# Altium PCB PCB1.PcbDoc (part 1 of 2)
Units mm, origin at the board's own origin, x right, y up, seen from the top; angles counter-clockwise.
Board outline 185 x 38 mm, 4 copper layers (Top Layer, POWER, GND, Bottom Layer), stack 0.603 mm thick; 116 components, 81 nets, 423 pads, 394 vias.
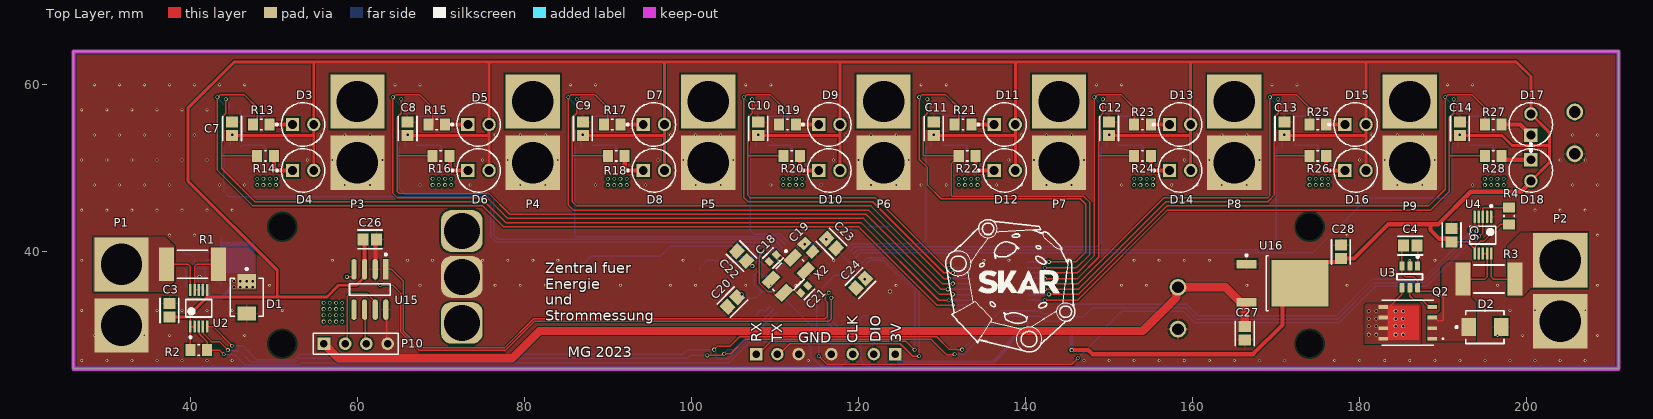
[diagram p0: Top Layer view]
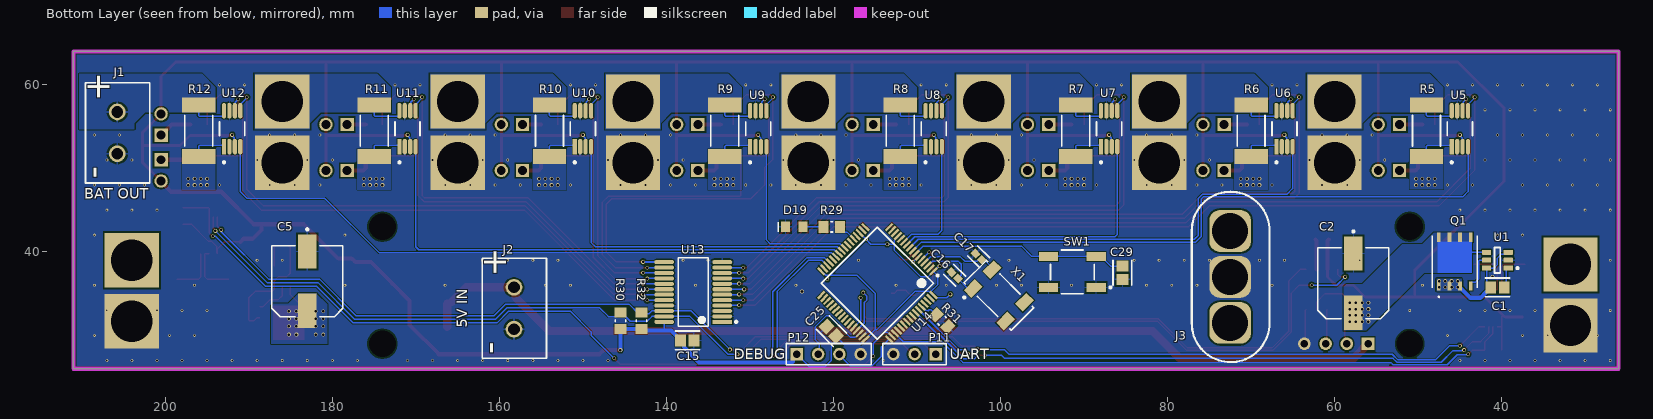
[diagram p1: Bottom Layer view, seen from below]
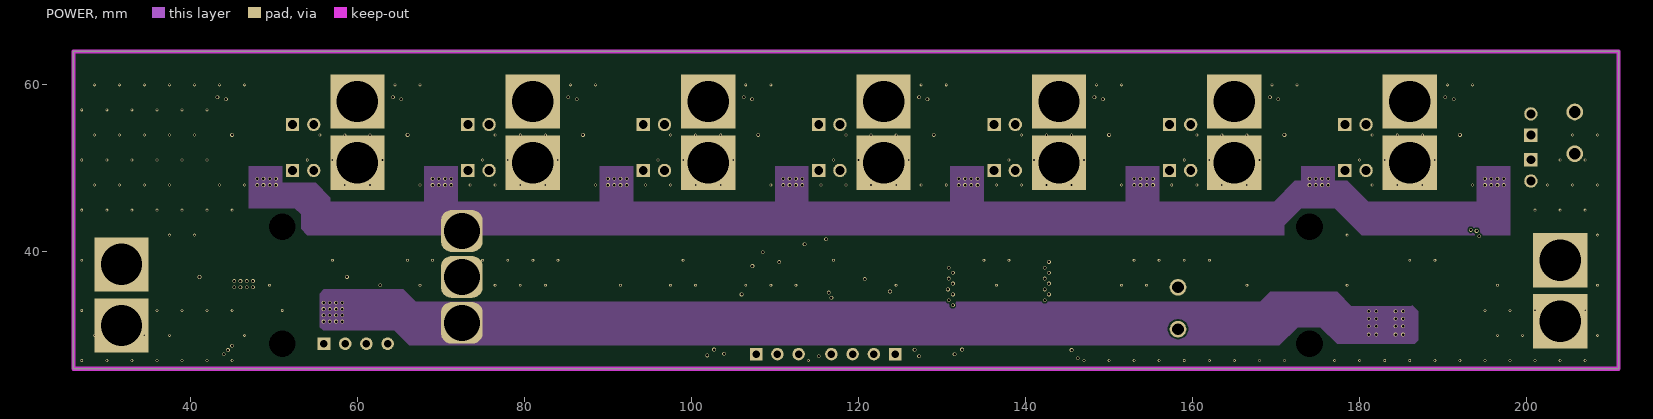
[diagram p2: POWER]
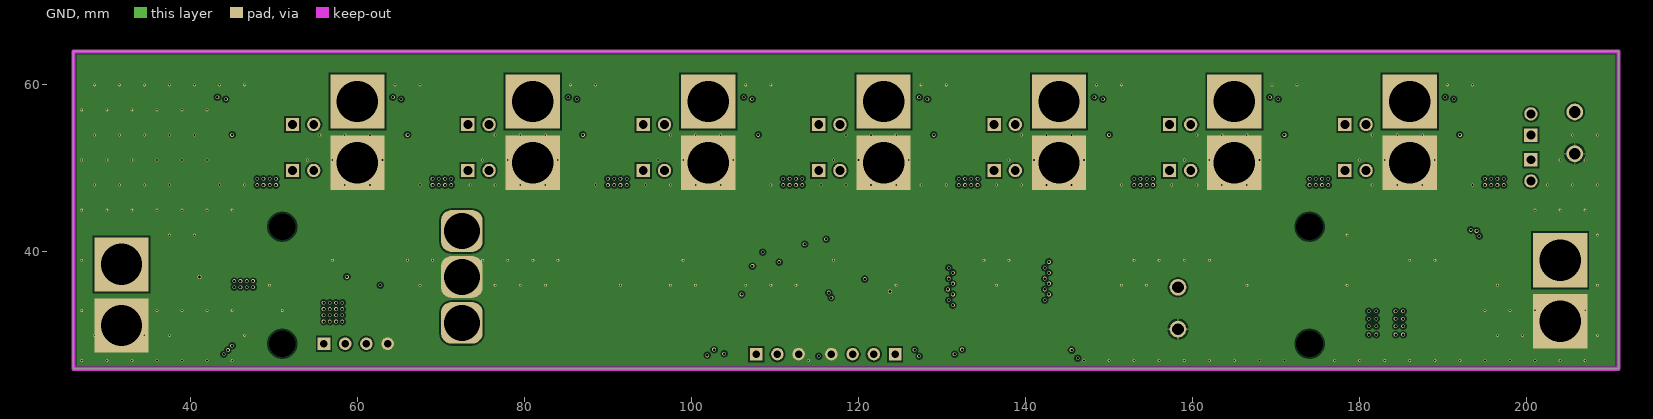
[diagram p3: GND]
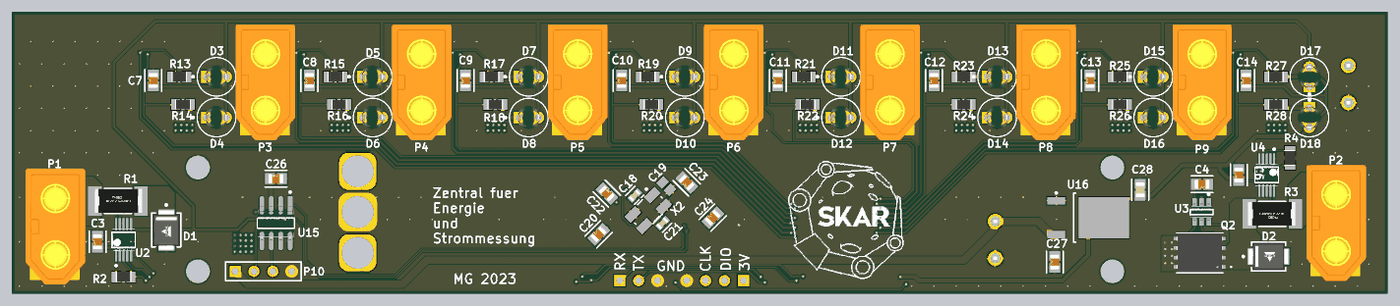
[diagram p5: 3D render of the assembled board from above, using the file's embedded part models]
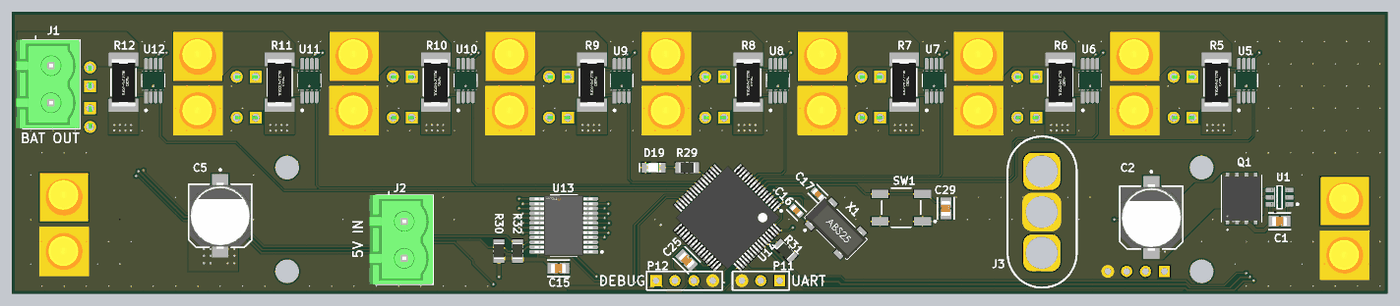
[diagram p6: 3D render of the assembled board from below, using the file's embedded part models]

## Layer stack, top to bottom
Top Solder: solder mask 0.0102, Solder Resist, Dk 3.5
Top Layer: signal copper 0.0356
Dielectric 2: prepreg 0.0711, PP-006, Dk 4.1
POWER: signal copper 0.035
Dielectric 1: dielectric 0.32, FR-4, Dk 4.8
GND: signal copper 0.035
Dielectric 3: prepreg 0.0711, PP-006, Dk 4.1
Bottom Layer: signal copper 0.0356
Bottom Solder: solder mask 0.0102, Solder Resist, Dk 3.5

## Board outline
26,26 26,64 211,64 211,26

## Design rules (kind name [scope] priority, off if disabled: settings)
Clearance Clearance_POWER [(InNet('NetC205_2') OR InNet('NETC203_2') OR InNet('NETC206_2') OR InNet('NetP410_1') OR InNet('NetP410_3') OR InNet('VM'))] p1: gap=0.254 ignorepadtopadclearanceinfootprint=FALSE except(0: SMDPad-Hole THPad-Hole Via-Hole Fill-Hole Poly-Hole Region-Hole Text-Hole; 0.1: Arc-Arc Arc-Track Track-Track; 0.127: Arc-THPad Arc-Fill Arc-Poly Arc-Region Track-THPad Track-Fill Track-Poly Track-Region SMDPad-SMDPad; 0.2: Arc-SMDPad Track-SMDPad; 0.5: THPad-THPad THPad-Fill THPad-Poly THPad-Region Fill-Fill Fill-Poly Fill-Region Poly-Poly Poly-Region Region-Region)
Clearance [All] p2: gap=0.127 ignorepadtopadclearanceinfootprint=FALSE except(0: SMDPad-Hole THPad-Hole Via-Hole Fill-Hole Poly-Hole Region-Hole Text-Hole; 0.1: Arc-Arc Arc-Track Track-Track; 0.2: Arc-SMDPad Track-SMDPad THPad-Fill THPad-Poly THPad-Region Via-Fill Via-Poly Via-Region; 0.254: Arc-Via Arc-Text Arc-Hole Track-Via Track-Text Track-Hole SMDPad-THPad SMDPad-Via SMDPad-Text THPad-Via THPad-Text Via-Via Via-Text Fill-Text Poly-Text Region-Text Text-Text; 0.5: THPad-THPad)
ComponentClearance [All] p1: gap=0.127 collisioncheckmode=3 verticalgap=0.254 showdistances=FALSE
HoleSize [All] p1: absolutevalues=TRUE maxlimit=6.5 minlimit=0.025 maxpercent=80.000 minpercent=20.000
MinimumSolderMaskSliver [All] p1: minsoldermaskwidth=0.08
PlaneClearance [All] p1: clearance=0.2
PlaneConnect [All] p1: planeconnectstyle=Direct reliefexpansion=0.508 reliefentries=4 reliefconductorwidth=0.254 reliefairgap=0.254
PolygonConnect PolygonConnect_GND_POWER [InNet('GND') vs (HasFootprint('FP-FC-G-MFG') OR HasFootprint('FP-CL32-IPC_B') OR HasFootprint('TSON Advance_TOS') OR HasFootprint('XT60+MR60') OR HasFootprint('XT-60') OR HasFootprint('FP-SMAJ-CA-MFG') OR InNamedPolygon('GND_L01_P000'))] p1: connectstyle=Direct reliefconductorwidth=0.254 reliefentries=4 polygonreliefangle="90 Angle" airgapwidth=0.254
PolygonConnect PolygonConnect_GND [InNet('GND')] p2: thpad.connectstyle=Direct thpad.reliefconductorwidth=0.254 thpad.reliefentries=4 thpad.polygonreliefangle="90 Angle" thpad.airgapwidth=0.254 smdpad.connectstyle=Relief smdpad.reliefconductorwidth=0.2 smdpad.reliefentries=4 smdpad.polygonreliefangle="90 Angle" smdpad.airgapwidth=0.2 via.connectstyle=Direct via.reliefconductorwidth=0.254 via.reliefentries=4 via.polygonreliefangle="90 Angle" via.airgapwidth=0.254
PolygonConnect [All] p3: connectstyle=Direct reliefconductorwidth=0.254 reliefentries=4 polygonreliefangle="90 Angle" airgapwidth=0.254
RoutingVias [All] p1: holewidth=0.3 width=0.45 viastyle="Through Hole" minholewidth=0.3 minwidth=0.45 maxholewidth=0.55 maxwidth=0.7
SilkToSilkClearance [All] p1: silktosilkclearance=0
SilkToSolderMaskClearance [IsPad] p1: minsilkscreentomaskgap=0.15 clearancetoexposedcopper=TRUE
SolderMaskExpansion [All] p1: expansion=0.1 istentingtop=FALSE
Width Width_voltage [InNetClass('Voltage')] p1: maxlimit=1 minlimit=0.18 preferedwidth=0.254 toplayer_prefwidth=0.18 midlayer1_minwidth=0.254 midlayer1_maxwidth=0.254 midlayer2_minwidth=0.254 midlayer2_maxwidth=0.254 bottomlayer_prefwidth=0.18 minimp=50.000000 maximp=50.000000 favimp=50.000000
Width [All] p2: maxlimit=0.5 minlimit=0.127 preferedwidth=0.254 toplayer_prefwidth=0.18 bottomlayer_prefwidth=0.18 minimp=50.000000 maximp=50.000000 favimp=50.000000
23 further rules are at their usual default settings.

## Classes and differential pairs
net class Voltage: +3.3 +5 GND
component class MCU: C16 C17 C18 C19 C20 C21 C22 C23 C24 C25 C26 C27 C28 C29 D19 J2 P10 P11 P12 R29 R30 R31 R32 SW1 U14 U15 U16 X1 X2
component class Output: C7 C8 C9 C10 C11 C12 C13 C14 C15 D3 D4 D5 D6 D7 D8 D9 D10 D11 D12 D13 D14 D15 D16 D17 D18 J1 P3 P4 P5 P6 P7 P8 P9 R5 R6 R7 R8 R9 R10 R11 R12 R13 R14 R15 R16 R17 R18 R19 R20 R21 R22 R23 R24 R25 R26 R27 R28 U5 U6 U7 U8 U9 U10 U11 U12 U13
component class Input: C1 C2 C3 C4 C5 C6 D1 D2 J3 P1 P2 Q1 Q2 R1 R2 R3 R4 U1 U2 U3 U4

## Components (designator, comment, footprint, x,y, rotation, side; value= is the part's Value field where it differs from the comment)
C1 "100nF" FP-0805-L_2_01_0_2-W_1_25-IPC_B 40.5,35.75 r180 bottom
C2 "50SEV47M8X10.5" FP-SEV8X10_5-MFG 57.75,36.25 r270 bottom
C3 "100nF" FP-0805-L_2_01_0_2-W_1_25-IPC_B 37.5,33 r270 top
C4 "100nF" FP-0805-L_2_01_0_2-W_1_25-IPC_B 186.056,40.75 r0 top
C5 "50SEV47M8X10.5" FP-SEV8X10_5-MFG 183,36.5 r270 bottom
C6 "100nF" FP-0805-L_2_01_0_2-W_1_25-IPC_B 191,42 r270 top
C7 "08051C104KAT2A" FP-0805-L_2_01_0_2-W_1_25-IPC_B 45,54.75 r270 top
C8 "08051C104KAT2A" FP-0805-L_2_01_0_2-W_1_25-IPC_B 66,54.75 r270 top
C9 "08051C104KAT2A" FP-0805-L_2_01_0_2-W_1_25-IPC_B 87,54.75 r270 top
C10 "08051C104KAT2A" FP-0805-L_2_01_0_2-W_1_25-IPC_B 108,54.75 r270 top
C11 "08051C104KAT2A" FP-0805-L_2_01_0_2-W_1_25-IPC_B 129,54.75 r270 top
C12 "08051C104KAT2A" FP-0805-L_2_01_0_2-W_1_25-IPC_B 150,54.75 r270 top
C13 "08051C104KAT2A" FP-0805-L_2_01_0_2-W_1_25-IPC_B 171,54.75 r270 top
C14 "08051C104KAT2A" FP-0805-L_2_01_0_2-W_1_25-IPC_B 192,54.75 r270 top
C15 "08051C104KAT2A" FP-0805-L_2_01_0_2-W_1_25-IPC_B 137.5,29.4 r180 bottom
C16 "C1608C0G1H060C080AA" FP-C1608-080-0_1-IPC_C 105.482,37.182 r225 bottom
C17 "C1608C0G1H060C080AA" FP-C1608-080-0_1-IPC_C 102.6,39.4 r225 bottom
C18 "C0603C180J1GACTU" FP-C0603C-CF-MFG 109.75,39.25 r225 top value="18 pF"
C19 "C0805C105K4PACTU" CAPC2013X145X50LL20T25 114,40.5 r135 top
C20 "08051C104KAT2A" FP-0805-L_2_01_0_2-W_1_25-IPC_B 104.9,34 r225 top
C21 "C0603C180J1GACTU" FP-C0603C-CF-MFG 113.5,35.5 r45 top value="18 pF"
C22 "08051C104KAT2A" FP-0805-L_2_01_0_2-W_1_25-IPC_B 106,39.5 r135 top
C23 "08051C104KAT2A" FP-0805-L_2_01_0_2-W_1_25-IPC_B 116.75,41 r315 top
C24 "08051C104KAT2A" FP-0805-L_2_01_0_2-W_1_25-IPC_B 120.25,36.25 r225 top
C25 "08051C104KAT2A" FP-0805-L_2_01_0_2-W_1_25-IPC_B 120.25,30.5 r45 bottom
C26 "100nF" FP-0805-L_2_01_0_2-W_1_25-IPC_B 61.5,41.5 r180 top
C27 "08051C104KAT2A" FP-0805-L_2_01_0_2-W_1_25-IPC_B 166.25,30.25 r270 top
C28 "C0805C106K8PACTU" FP-C0805C-DG-IPC_B 177.75,40 r90 top value=10uF
C29 "08051C104KAT2A" FP-0805-L_2_01_0_2-W_1_25-IPC_B 85.4,37.5 r90 bottom
D1 "SMBJ30A-E3/52" FP-SMBJ30A-E3-52-0 46.75,34.563 r270 top
D2 "SMBJ30A-E3/52" FP-SMBJ30A-E3-52-0 195,31 r0 top
D3 "TLLG4401" FP-6_544-5255_01-4-MFG 53.5,55.25 r0 top
D4 "TLLG4401" FP-6_544-5255_01-4-MFG 53.5,49.75 r0 top
D5 "TLLG4401" FP-6_544-5255_01-4-MFG 74.5,55.25 r0 top
D6 "TLLG4401" FP-6_544-5255_01-4-MFG 74.5,49.75 r0 top
D7 "TLLG4401" FP-6_544-5255_01-4-MFG 95.5,55.25 r0 top
D8 "TLLG4401" FP-6_544-5255_01-4-MFG 95.5,49.75 r0 top
D9 "TLLG4401" FP-6_544-5255_01-4-MFG 116.5,55.25 r0 top
D10 "TLLG4401" FP-6_544-5255_01-4-MFG 116.5,49.75 r0 top
D11 "TLLG4401" FP-6_544-5255_01-4-MFG 137.5,55.25 r0 top
D12 "TLLG4401" FP-6_544-5255_01-4-MFG 137.5,49.75 r0 top
D13 "TLLG4401" FP-6_544-5255_01-4-MFG 158.5,55.25 r0 top
D14 "TLLG4401" FP-6_544-5255_01-4-MFG 158.5,49.75 r0 top
D15 "TLLG4401" FP-6_544-5255_01-4-MFG 179.5,55.25 r0 top
D16 "TLLG4401" FP-6_544-5255_01-4-MFG 179.5,49.75 r0 top
D17 "TLLG4401" FP-6_544-5255_01-4-MFG 200.5,55.25 r90 top
D18 "TLLG4401" FP-6_544-5255_01-4-MFG 200.5,49.75 r270 top
D19 "150080SS75000" WL-SMCW_0805_150080xx75000 124.7,43 r180 bottom
J1 "Connector_2" Phoenix 205.75,56.75 r90 bottom
J2 "Connector_2" Phoenix 158.25,35.75 r90 bottom
J3 "Component_1" PCBComponent_1 72.5,37 r90 bottom
P1 "XT-60 Connector" 2 27.711,42.894 r270 top
P2 "XT-60 Connector" 2 199.961,43.394 r270 top
P3 "XT-60 Connector" 2 55.961,62.394 r270 top
P4 "XT-60 Connector" 2 76.961,62.394 r270 top
P5 "XT-60 Connector" 2 97.961,62.394 r270 top
P6 "XT-60 Connector" 2 118.961,62.394 r270 top
P7 "XT-60 Connector" 2 139.961,62.394 r270 top
P8 "XT-60 Connector" 2 160.961,62.394 r270 top
P9 "XT-60 Connector" 2 181.961,62.394 r270 top
P10 "Header 4" HDR1X4 56,29 r0 top
P11 "Header 3" HDR1X3 107.75,27.75 r0 bottom
P12 "Header 4" HDR1X4 124.37,27.75 r180 bottom
Q1 "DMT6005LPS-13" POWERDI5060-8_DIO-M 45.615,38.829 r90 bottom
Q2 "DMT6005LPS-13" POWERDI5060-8_DIO-M 185.75,31.5 r180 top
R1 "R002" FP-RL2512-MFG 40.25,38.5 r0 top value=100mΩ
R2 "2.2k" RESC2013X60X35ML10T20 41,28.25 r180 top
R3 "R002" FP-RL2512-MFG 195.5,36.75 r180 top value=100mΩ
R4 "2.2k" RESC2013X60X35ML10T20 197.9,44.3 r270 top
R5 "RL2512FK-070R1L" FP-RL2512-MFG 49,54.5 r270 bottom value=100mΩ
R6 "RL2512FK-070R1L" FP-RL2512-MFG 70,54.5 r270 bottom value=100mΩ
R7 "RL2512FK-070R1L" FP-RL2512-MFG 91,54.5 r270 bottom value=100mΩ
R8 "RL2512FK-070R1L" FP-RL2512-MFG 112,54.5 r270 bottom value=100mΩ
R9 "RL2512FK-070R1L" FP-RL2512-MFG 133,54.5 r270 bottom value=100mΩ
R10 "RL2512FK-070R1L" FP-RL2512-MFG 154,54.5 r270 bottom value=100mΩ
R11 "RL2512FK-070R1L" FP-RL2512-MFG 175,54.5 r270 bottom value=100mΩ
R12 "RL2512FK-070R1L" FP-RL2512-MFG 196,54.5 r270 bottom value=100mΩ
R13 "1K" RESC2013X60X35ML10T20 48.5,55.25 r0 top
R14 "1K" RESC2013X60X35ML10T20 49,51.5 r0 top
R15 "1K" RESC2013X60X35ML10T20 69.5,55.25 r0 top
R16 "1K" RESC2013X60X35ML10T20 70,51.5 r0 top
R17 "1K" RESC2013X60X35ML10T20 90.5,55.25 r0 top
R18 "1K" RESC2013X60X35ML10T20 91,51.5 r0 top
R19 "1K" RESC2013X60X35ML10T20 111.5,55.25 r0 top
R20 "1K" RESC2013X60X35ML10T20 112,51.5 r0 top
R21 "1K" RESC2013X60X35ML10T20 132.5,55.25 r0 top
R22 "1K" RESC2013X60X35ML10T20 133,51.5 r0 top
R23 "1K" RESC2013X60X35ML10T20 154,55.25 r0 top
R24 "1K" RESC2013X60X35ML10T20 154,51.5 r0 top
R25 "1K" RESC2013X60X35ML10T20 175,55.25 r0 top
R26 "1K" RESC2013X60X35ML10T20 175,51.5 r0 top
R27 "1K" RESC2013X60X35ML10T20 196,55.25 r0 top
R28 "1K" RESC2013X60X35ML10T20 196,51.5 r0 top
R29 "1K" RESC2013X60X35ML10T20 120.2,43 r0 bottom
R30 "2.2k" RESC2013X60X35ML10T20 145.5,31.75 r270 bottom
R31 "10k" RESC2013X60X35ML10T20 107,31.75 r45 bottom
R32 "2.2k" RESC2013X60X35ML10T20 143,31.75 r270 bottom
SW1 "PTS525SM10SMTRLFS" CKCP-PTS525SM10SMTR-4_V 91.4,37.6 r0 bottom
U1 "LM74700QDBVTQ1" FP-DBV0006A-MFG 40.5,39 r0 bottom
U2 "INA233AIDGSR" FP-DGS0010A-MFG 41,33.25 r90 top
U3 "LM74700QDBVTQ1" FP-DBV0006A-MFG 186,37 r270 top
U4 "INA233AIDGSR" FP-DGS0010A-MFG 194.75,42 r270 top
U5 "INA225AIDGKT" FP-INA225AIDGKT-IPC_A 45,54.75 r90 bottom
U6 "INA225AIDGKT" FP-INA225AIDGKT-IPC_A 66,54.75 r90 bottom
U7 "INA225AIDGKT" FP-INA225AIDGKT-IPC_A 87,54.75 r90 bottom
U8 "INA225AIDGKT" FP-INA225AIDGKT-IPC_A 108,54.75 r90 bottom
U9 "INA225AIDGKT" FP-INA225AIDGKT-IPC_A 129,54.75 r90 bottom
U10 "INA225AIDGKT" FP-INA225AIDGKT-IPC_A 150,54.75 r90 bottom
U11 "INA225AIDGKT" FP-INA225AIDGKT-IPC_A 171,54.75 r90 bottom
U12 "INA225AIDGKT" FP-INA225AIDGKT-IPC_A 192,54.75 r90 bottom
U13 "TCA9555DBR" FP-DB0024A-IPC_A 136.8,35.2 r0 bottom
U14 "STM32F103RBT6TR" STM-LQFP64_V 114.75,36.25 r315 bottom locked
U15 "SN65HVD230DR" FP-D0008A-IPC_A 61.5,35.5 r270 top
U16 "LD1117DT33TR" TO-252_M 170.75,36.25 r0 top
X1 "ABS25-32.768KHZ-6-T" ABRA-ABS25-4_V 100.2,34.8 r225 bottom
X2 "7B-8.000MAAJ-T" TXC-7B-4_V 111.6,37.2 r225 top

## Footprints (in the part's own frame and the unit in brackets; to place one, negate y for a bottom-side part, rotate by r counter-clockwise, add the part's x,y. Pads: shape width x height; smd on the part's side, far side on the other; paste and mask are expansions set on the pad)
2 [mm] "Battery Connector"
  rect 6.5x6.5 hole 4.95: 1(4.394,4.039) 2(11.709,4.039)
  body extent 0.07,0.13 15.67,8.13, height 16.4
ABRA-ABS25-4_V [mm] "SMD, 4-Leads, Body 8x3.8mm, Pitch 5.5mm, Height 2.5mm"
  rect 1.3x1.9 smd: 1(-2.75,-1.6) 2(2.75,-1.6) 3(2.75,1.6) 4(-2.75,1.6)
  silkscreen extent -4,-3.22 4,1.9, body extent -4,-2 4,2, height 2.66
CAPC2013X145X50LL20T25 [mm] "Chip Capacitor, 2-Leads, Body 2.00x1.25mm, IPC High Density"
  rect 1.1x1.35 smd: 1(-0.7,0) 2(0.7,0)
  body extent -1.1,-0.72 1.1,0.72, height 1.45
CKCP-PTS525SM10SMTR-4_V [mm] "SMD, 4-Leads, Body 5.25x5.25mm"
  rect 2.3x1.1 smd: 1(-2.85,1.85) 2(2.85,1.85) 3(-2.85,-1.85) 4(2.85,-1.85)
  silkscreen extent -4.67,-2.63 2.63,2.63, body extent -2.68,-2.68 2.68,2.68, height 1.5
FP-6_544-5255_01-4-MFG [mm]
  rect 1.6x1.6 hole 1.05 paste-2539.97 mask+0: 1(-1.27,0)
  round 1.6 hole 1.05 paste-2539.97 mask+0: 2(1.27,0)
  silkscreen extent -3.27,-2.6 2.6,2.6, body extent -2.32,-2.32 2.32,2.32, height 0.25
FP-0805-L_2_01_0_2-W_1_25-IPC_B [mm]
  rect 1.305x1.456 smd paste+0 mask+0: 1(-0.806,0) 2(0.806,0)
  silkscreen extent -1.46,-1.13 1.46,1.13, body extent -1,-0.63 1,0.63, height 1.4
FP-C0603C-CF-MFG [mm]
  rect 0.75x0.9 smd paste+0 mask+0: 1(-0.6,0) 2(0.6,0)
  silkscreen extent -0.87,-0.85 0.88,0.85, body extent -1.2,-0.6 1.2,0.6, height 0.25
FP-C0805C-DG-IPC_B [mm]
  rect 1.305x1.456 smd paste+0 mask+0: 1(-0.801,0) 2(0.801,0)
  silkscreen extent -1.45,-1.13 1.45,1.13, body extent -1.7,-0.98 1.7,0.98, height 0.25
FP-C1608-080-0_1-IPC_C [mm]
  rect 0.931x0.812 smd paste+0 mask+0: 1(-0.541,0) 2(0.541,0)
  silkscreen extent -1.01,-0.85 1.01,0.85, body extent -0.8,-0.4 0.8,0.4, height 0.9
FP-D0008A-IPC_A [mm]
  rect 2.469x0.622 smd paste+0 mask+0: 1(-2.414,1.905)
  rrect100% 2.469x0.622 smd paste+0 mask+0: 2(-2.414,0.635) 3(-2.414,-0.635) 4(-2.414,-1.905) 5(2.414,-1.905) 6(2.414,-0.635) 7(2.414,0.635) 8(2.414,1.905)
  silkscreen extent -4.32,-2.45 0.68,2.45, body extent -4.15,-2.95 4.15,2.95, height 0.25
FP-DB0024A-IPC_A [mm]
  rect 2.353x0.495 smd paste+0 mask+0: 1(-3.475,3.575)
  rrect100% 2.353x0.495 smd paste+0 mask+0: 2(-3.475,2.925) 3(-3.475,2.275) 4(-3.475,1.625) 5(-3.475,0.975) 6(-3.475,0.325) 7(-3.475,-0.325) 8(-3.475,-0.975) 9(-3.475,-1.625) 10(-3.475,-2.275) 11(-3.475,-2.925) 12(-3.475,-3.575) 13(3.475,-3.575) 14(3.475,-2.925) 15(3.475,-2.275) 16(3.475,-1.625) 17(3.475,-0.975) 18(3.475,-0.325) 19(3.475,0.325) 20(3.475,0.975) 21(3.475,1.625) 22(3.475,2.275) 23(3.475,2.925) 24(3.475,3.575)
  silkscreen extent -5.28,-4.1 1.8,4.1, body extent -3.9,-4.1 3.9,4.1, height 2
FP-DBV0006A-MFG [mm]
  rrect17% 1.1x0.6 smd paste+0 mask+0: 1(-1.3,0.95) 2(-1.3,0) 3(-1.3,-0.95) 4(1.3,-0.95) 5(1.3,0) 6(1.3,0.95)
  silkscreen extent -2.52,-1.53 0.35,1.53, body extent -1.4,-1.45 1.4,1.45, height 1.45
FP-DGS0010A-MFG [mm]
  rrect33% 1.45x0.3 smd paste+0 mask+0: 1(-2.2,1) 2(-2.2,0.5) 3(-2.2,0) 4(-2.2,-0.5) 5(-2.2,-1) 6(2.2,-1) 7(2.2,-0.5) 8(2.2,0) 9(2.2,0.5) 10(2.2,1)
  silkscreen extent -3.6,-1.55 1.05,1.55, body extent -3.03,-1.8 3.03,1.8, height 0.25
FP-INA225AIDGKT-IPC_A [mm]
  rect 1.857x0.498 smd paste+0 mask+0: 1(-2.151,0.975)
  rrect100% 1.857x0.498 smd paste+0 mask+0: 2(-2.151,0.325) 3(-2.151,-0.325) 4(-2.151,-0.975) 5(2.151,-0.975) 6(2.151,-0.325) 7(2.151,0.325) 8(2.151,0.975)
  silkscreen extent -4.15,-1.5 0.85,1.5, body extent -2.45,-1.5 2.45,1.5, height 1.1
FP-RL2512-MFG [mm]
  rect 1.8x4 smd paste+0 mask+0: 1(-3.1,0) 2(3.1,0)
  silkscreen extent -1.83,-1.68 1.83,1.68, body extent -4.1,-2.1 4.1,2.1, height 0.25
FP-SEV8X10_5-MFG [mm]
  rect 4.1x2.2 smd paste+0 mask+0: 1(-3.55,0) 2(3.55,0)
  silkscreen extent -6.32,-4.25 4.25,4.25, body extent -4.45,-4.15 4.45,4.15, height 10.5
FP-SMBJ30A-E3-52-0 [mm]
  rect 1.716x2.18 smd paste+0 mask+0: 1(-1.937,0) 2(1.937,0)
  silkscreen extent -3.52,-1.97 2.28,1.97, body extent -2.7,-1.81 2.7,1.81, height 2.44
HDR1X3 [mm] "Connector; Header; 3 Position"
  rect 1.5x1.5 hole 0.9: 1(0,0)
  round 1.5 hole 0.9: 2(2.54,0) 3(5.08,0)
  silkscreen extent -1.27,-1.27 6.35,1.27
HDR1X4 [mm] "Connector; Header; 4 Position"
  rect 1.5x1.5 hole 0.9: 1(0,0)
  round 1.5 hole 0.9: 2(2.54,0) 3(5.08,0) 4(7.62,0)
  silkscreen extent -1.27,-1.27 8.89,1.27
PCBComponent_1 [mm]
  rrect50% 5x5 hole 4.3 paste-2539.97: 1(-5.5,0) 2(0,0) 3(5.5,0)
  silkscreen extent -10.2,-4.7 10.2,4.6
Phoenix [mm]
  round 2 hole 1.4 paste-2539.97: 1(0,0) 2(-5,0)
  silkscreen extent -8.5,-3.9 3.5,3.8, body extent -8.5,-3.87 3.5,4.7, height 12.1
POWERDI5060-8_DIO-M [mil]
  rect 44x18 smd paste+0 mask+0: 1(-115,75) 2(-115,25) 3(-115,-25) 4(-115,-75) 5(115,-75) 6(115,-25) 7(115,25) 8(115,75)
  Top Layer region: 93,-80.5 93,80.5 -52,80.5 -52,-80.5
  silkscreen extent -169,-107 123,107, body extent -121,-101 121,101, height 43
RESC2013X60X35ML10T20 [mm] "Chip Resistor, 2-Leads, Body 2.1x1.35mm, IPC Low Density"
  rect 1.2x1.45 smd: 1(-1,0) 2(1,0)
  silkscreen extent -0.1,-0.63 0.1,0.63, body extent -1.05,-0.68 1.05,0.67, height 0.6
STM-LQFP64_V [mm] "Thin QFP, 64-Leads, Body 10x10mm, Pitch 0.5mm, ST Recommended"
  rect 1.2x0.3 smd: 1(-5.75,3.75) 2(-5.75,3.25) 3(-5.75,2.75) 4(-5.75,2.25) 5(-5.75,1.75) 6(-5.75,1.25) 7(-5.75,0.75) 8(-5.75,0.25) 9(-5.75,-0.25) 10(-5.75,-0.75) 11(-5.75,-1.25) 12(-5.75,-1.75) 13(-5.75,-2.25) 14(-5.75,-2.75) 15(-5.75,-3.25) 16(-5.75,-3.75) 33(5.75,-3.75) 34(5.75,-3.25) 35(5.75,-2.75) 36(5.75,-2.25) 37(5.75,-1.75) 38(5.75,-1.25) 39(5.75,-0.75) 40(5.75,-0.25) 41(5.75,0.25) 42(5.75,0.75) 43(5.75,1.25) 44(5.75,1.75) 45(5.75,2.25) 46(5.75,2.75) 47(5.75,3.25) 48(5.75,3.75)
  rect 0.3x1.2 smd: 17(-3.75,-5.75) 18(-3.25,-5.75) 19(-2.75,-5.75) 20(-2.25,-5.75) 21(-1.75,-5.75) 22(-1.25,-5.75) 23(-0.75,-5.75) 24(-0.25,-5.75) 25(0.25,-5.75) 26(0.75,-5.75) 27(1.25,-5.75) 28(1.75,-5.75) 29(2.25,-5.75) 30(2.75,-5.75) 31(3.25,-5.75) 32(3.75,-5.75) 49(3.75,5.75) 50(3.25,5.75) 51(2.75,5.75) 52(2.25,5.75) 53(1.75,5.75) 54(1.25,5.75) 55(0.75,5.75) 56(0.25,5.75) 57(-0.25,5.75) 58(-0.75,5.75) 59(-1.25,5.75) 60(-1.75,5.75) 61(-2.25,5.75) 62(-2.75,5.75) 63(-3.25,5.75) 64(-3.75,5.75)
  silkscreen extent -5.87,-4.75 4.75,4.75, body extent -6,-6 6,6, height 1.6
TO-252_M [mm] "D-PAK, 4-Leads, Body 6.1x6.5mm, Pitch 2.28mm, Lead Span 9.7mm, IPC Low Density"
  rect 2.4x1 smd: 1(-4.3,2.28) 3(-4.3,-2.28)
  rect 6.8x5.55 smd: 4(2.1,0)
  silkscreen extent -4.42,-3.3 -1.7,3.45, body extent -1.95,-3.3 4.25,3.3, height 2.4
TXC-7B-4_V [mm] "SMD, 4-Leads, Body 5x3.2mm, Pitch 3.7mm"
  rect 2x1.2 smd: 1(-1.85,-1.1) 2(1.85,-1.1) 3(1.85,1.1) 4(-1.85,1.1)
  silkscreen extent -2.5,-2.37 2.5,1.6, body extent -2.5,-1.6 2.5,1.6, height 1.05
WL-SMCW_0805_150080xx75000 [mm] "SMD Mono-color Chip LED, body 2.0x1.25mm"
  rect 1.1x1.3 smd: 1(-1.05,0) 2(1.05,0)
  silkscreen extent -2,-0.6 -1.8,0.6, body extent -1,-0.63 1,0.62, height 0.7

## Part data
C1 C3 C4 C6 C26: library part CMP-2007-04174-2, "General Purpose Ceramic Capacitor, 0805, 100nF, 10%, X7R, 15%, 100V", Case Code (Imperial)=0805, Case Code (Metric)=2012, Dielectric=X7R, Dielectric Material=Ceramic, Max Operating Temperature=125°C, Min Operating Temperature=-55°C, Package Quantity=2000, Tolerance=10%, Voltage=100V, Capacitance=100nF, Case/Package=0805, Construction=Flat, Contact Plating=Tin, Depth=1.25mm, Height=1.4mm, Lead Free="Lead Free", Length=2.01mm, Mount="Surface Mount", Number of Pins=2, Packaging="Tape and Reel", Radiation Hardening=No, REACH SVHC="No SVHC", RoHS Compliant=Yes, Series=-, Termination=SMD/SMT, Thickness=0.055inch, Voltage Rating=100V, Voltage Rating (DC)=100V, Width=0.049inch
C2 C5: library part CMP-35376-000024-1, "CAP ALUM 47UF 20% 50V SMD", Capacitance=47uF, Case/Package=Radial, Max Operating Temperature=85°C, Min Operating Temperature=-40°C, Package Quantity=1, Ratings=AEC-Q200, Ripple Current=240mA, Tolerance=20%, Voltage Rating=50V, Construction=Cylindrical, Height - Seated (Max)=0.413inch, Lead Free="Lead Free", Lead Pitch=3.1mm, Life (Hours)=2000Hour, Mount="Surface Mount", Packaging="Tape and Reel", Polarity=Polar, Radiation Hardening=No, RoHS Compliant=Yes, Series=SEV
C7 C8 C9 C10 C11 C12 C13 C14 C15 C20 C22 C23 C24 C25 C27 C29: library part CMP-2007-04174-2, "General Purpose Ceramic Capacitor, 0805, 100nF, 10%, X7R, 15%, 100V", Capacitance=100nF, Case Code (Imperial)=0805, Case Code (Metric)=2012, Dielectric=X7R, Dielectric Material=Ceramic, Max Operating Temperature=125°C, Min Operating Temperature=-55°C, Package Quantity=2000, Tolerance=10%, Voltage=100V, Case/Package=0805, Construction=Flat, Contact Plating=Tin, Depth=1.25mm, Height=1.4mm, Lead Free="Lead Free", Length=2.01mm, Mount="Surface Mount", Number of Pins=2, Packaging="Tape and Reel", Radiation Hardening=No, REACH SVHC="No SVHC", RoHS Compliant=Yes, Series=-, Termination=SMD/SMT, Thickness=0.055inch, Voltage Rating=100V, Voltage Rating (DC)=100V, Width=0.049inch
C16 C17: library part CMP-08246-006295-1, "Multilayer Ceramic Capacitors 6pF ±0.25pF 50V C0G SMD 0603", Capacitance=6pF, Case Code (Imperial)=0603, Case Code (Metric)=1608, Dielectric=C0G, Dielectric Material=Ceramic, Max Operating Temperature=125°C, Min Operating Temperature=-55°C, Package Quantity=4000, Voltage Rating=50V, Case/Package=0603, Construction=Flat, Depth=0.8mm, Height=0.8mm, Lead Free="Lead Free", Length=1.6mm, Mount="Surface Mount", Packaging="Tape and Reel", REACH SVHC="No SVHC", RoHS Compliant=Yes, Series=C, Termination=SMD/SMT, Thickness=0.037inch, Voltage Rating (DC)=50V, Weight=7.1E-05oz, Width=0.031inch
C18 C21: library part CMP-2006-03103-2, "CAP CER 18PF 100V 5% NP0 0603", Capacitance="18 pF", Manufacturer=KEMET, Package=C0603C-CF, Temperature="-55°C to +125°C", Temperature Characteristic=C0G, Temperature Coefficient=30ppm/°C, Temperature Range High=+125°C, Temperature Range Low=-55°C, Tolerance=0.05, Voltage Rating="100 V", Automotive=Yes, Automotive Grade="Grade 1", Category=Cap, ComponentLink2Description=Datasheet, ComponentLink2URL=https://api.kemet.com/component-edge/download/datasheet/C0603C100J5GACAUTO.pdf, Device Class L1="Passive Components", Device Class L2=Capacitors, Device Class L3="Ceramic Capacitors", Digikey Description="CAP CER 18PF 100V 5% NP0 0603", Height=0.87mm, Lead Free=Yes, Manufacturer Part Number=C0603C180J1GACTU, Material=Ceramic, Mouser Description="Multilayer Ceramic Capacitors MLCC - SMD/SMT 100volts 18pF C0G 5%", Octopart=https://octopart.com/c0603c180j1gactu-kemet-9138579, RoHS=TRUE
C19: library part CMP-1036-04746-2, Manufacturer=Kemet, Part Number=C0805C105K4PACTU
C28: library part CMP-2007-03243-2, "CAP CER 10UF 10V X5R 0805", 3DS Part Number=220-00001, Capacitance=10uF, Manufacturer=Kemet, Package=C0805C-DG, Temperature="-55°C to +85°C", Temperature Characteristic=X5R, Temperature Coefficient=15%, Temperature Range High=+85°C, Temperature Range Low=-55°C, Tolerance=10%, Voltage=10V, Automotive=No, Category=Cap, ComponentLink2Description=Datasheet, ComponentLink2URL=https://content.kemet.com/datasheets/KEM_C1006_X5R_SMD.pdf, Device Class L1="Passive Components", Device Class L2=Capacitors, Device Class L3="Ceramic Capacitors", Digikey Description="CAP CER 10UF 10V X5R 0805", Height=1.4mm, Ipc Land Pattern Name=CAPC200125X125, Lead Free=Yes, Manufacturer Part Number=C0805C106K8PACTU, Material=Ceramic, Mouser Description="CAP CER 10UF 10V X5R 0805", Octopart=https://octopart.com/c0805c106k8pactu-kemet-98697, RoHS=TRUE, Voltage Rating=10V
D1 D2: library part CMP-02577-000026-1, "TVS DIODE 30VWM 48.4VC DO214AA", Breakdown Voltage=36.8V, Case/Package=DO-214AA, Clamping Voltage=48.4V, Leakage Current=1uA, Max Operating Temperature=150°C, Max Power Dissipation=600W, Max Surge Current=12.4A, Min Breakdown Voltage=33.3V, Min Operating Temperature=-55°C, Operating Supply Voltage=30V, Package Quantity=750, Power Line Protection=No, Resistor Type=Zener, Test Current=1mA, Clamping Voltage-Max=48.4V, Diode Type=ZENER, Direction=Unidirectional, Element Configuration=Single, Height=2.24mm, Lead Free="Lead Free", Length=4.57mm, Max Breakdown Voltage=36.8V, Max Reverse Leakage Current=1uA, Mount="Surface Mount", Number Of Channels=1, Number of Elements=1, Number of Pins=2, Number of Unidirectional Channels=1, Packaging="Tape and Reel", Peak Pulse Current=12.4A, Peak Pulse Power=600W, Polarity=Unidirectional, Power Dissipation=600W, Radiation Hardening=No, Reverse Breakdown Voltage=33.3V, Reverse Standoff Voltage=30V, RoHS Compliant=Yes, Series=TransZorb®, Termination=SMD/SMT, Width=3.94mm
D3 D4 D5 D6 D7 D8 D9 D10 D11 D12 D13 D14 D15 D16 D17 D18: library part CMP-00030-39390728-1, "TLLG4401 LED, Green, 2mcd, 3mmDia., T-1, +/-25deg, 565nm, 7mA, 1.9V Vf, 20V Vr, 20mW, -40", Ambient Temperature Range High=100°C, Case/Package=Radial, Color=Green, Forward Current=2mA, Forward Voltage=1.9V, Min Operating Temperature=-40°C, Power Dissipation=20mW, Reverse Voltage=6V, Voltage Rating (DC)=2.4V, Depth=3.2mm, Dominant Wavelength=575nm, Height=4.5mm, Illumination Color=Green, Lead Free="Lead Free", Lead Length=23mm, Length=3.2mm, Lens Color=Green, Lens Style="Circular, Colored, Diffused, Dome, Round, Tinted", Lens Transparency=Diffused, Luminous Intensity=2mcd, Max Junction Temperature (Tj)=100°C, Max Operating Temperature=100°C, Mount="Through Hole", NexarPartId=39390728, Number of Elements=1, Number of LEDs=1, Number of Pins=2, Packaging=Bulk, Peak Wavelength=565nm, Radiation Hardening=No, REACH SVHC=Unknown, RoHS=Compliant, Schedule B="8541402000, 8541402000", Test Current=2mA, Viewing Angle=25°, Wavelength=575nm
D19: library part CMP-1426-00010-3, Case Code (Imperial)=0805, Case Code (Metric)=2012, Color=Red, Forward Current=100mA, Forward Voltage=1.9V, Max Junction Temperature (Tj)=95°C, Max Operating Temperature=85°C, Max Reverse Voltage (DC)=5V, Min Operating Temperature=-40°C, Power Dissipation=72mW, Test Current=20mA, Case/Package=0805, Dominant Wavelength=630nm, Height=700µm, Length=2mm, Lens Style="Clear, Rectangular", Luminous Intensity=60mcd, Mount="Surface Mount", NexarPartId=29717782, Packaging="Tape and Reel", Peak Wavelength=645nm, REACH SVHC=Unknown, Reverse Voltage=5V, RoHS=Compliant, Viewing Angle=140°, Wavelength=630nm, Width=1.25mm
P1 P2 P3 P4 P5 P6 P7 P8 P9: Colour=yellow, Manufacturer=POLOLU, Manufacturer Part Number="XT60 YELLOW", Maximum current=65A, Category="Power Supply Modules", ComponentLink1Description=http://static.tme.eu/products_pics/8/b/5/8b5040a8a5baf3e0e67386c2e3a9b903/913.jpg, ComponentLink1URL=http://static.tme.eu/products_pics/8/b/5/8b5040a8a5baf3e0e67386c2e3a9b903/913.jpg, Information="Product is not a working device, but only component", MinAmount=1, Multiples=1, Number of Pins=2, Price Type=NET, Pricing 1="1=2.08, 10=1.95 (USD)", Stock 1=29, SuppliedAmount=0, Supplier 1=TME, Supplier Part Number 1="XT-60 Connector", Type of robotics accessories="power connector", Unit=pcs, Weight=7.267
P10 P12: "Header, 4-Pin", LatestRevisionDate=17-Jul-2002, LatestRevisionNote="Re-released for DXP Platform.", Publisher="Altium Limited"
P11: "Header, 3-Pin", LatestRevisionDate=17-Jul-2002, LatestRevisionNote="Re-released for DXP Platform.", Publisher="Altium Limited"
Q1 Q2: "No Description Available", Mfr_Name="Diodes Inc", Copyright="Copyright (C) 2023 Ultra Librarian. All rights reserved.", Manufacturer_Part_Number=DMT6005LPS-13, RefDes=RefDes, Type=DEV
R1 R3: library part CMP-03412-013102-1, "RES 0.1 OHM 1% 1W 2512", Manufacturer=YAGEO, Manufacturer Part Number=RL2512FK-070R1L, Package=RL2512, Power Rating=1W, Resistance=100mΩ, Temperature="-55°C to +155°C", Temperature Coefficient=600ppm/°C, Temperature Range High=+155°C, Temperature Range Low=-55°C, Tolerance=1%, Automotive=Yes, Automotive Grade="Grade 0", Category=Res, ComponentLink2Description=Datasheet, ComponentLink2URL=http://www.yageo.com/documents/recent/PYu-RL_Group_521_RoHS_L_2.pdf, Composition="Thick Film", Device Class L1="Passive Components", Device Class L2=Resistors, Device Class L3="Chip SMD Resistors", Digikey Description="RES 0.1 OHM 1% 1W 2512", Footprint Url=http://www.yageo.com/exep/pages/download/literatures/PYu-R_Mount_10.pdf, Height=0.65mm, Ipc Land Pattern Name=RESC635320X55, Lead Free=Yes, Mouser Description="Current Sense Resistors 0.1ohm 1% 1W", Octopart=https://octopart.com/rl2512fk-070r1l-yageo-42334369, RoHS=TRUE, Series=RL
R2 R4 R30 R31 R32: library part CMP-2100-03673-1, "Chip Resistor, 0 Ohm, Jumper, +/- 5%, 0.125 W, -55 to 155 degC, 0805 (2012 Metric), RoHS, Tape and Reel", Case Code (Imperial)=0805, Case Code (Metric)=2012, Manufacturer=Yageo, Max Operating Temperature=155degC, Min Operating Temperature=-55degC, Package Description="2-Pin Surface Mounted Device, Body 2 x 1.25 mm", Power Rating=125mW, Resistance=0mOhm, Temperature Coefficient=200ppm/degreesC, Tolerance=5%, Voltage Rating=150V, Case/Package=0805, Composition=ThickFilm, Contact Plating=Tin, Datasheet URL=http://www.yageo.com/NewPortal/yageodocoutput?fileName=/pdf/R-Chip/PYu-RC_Group_51_RoHS_L_5.pdf, Datasheet Version="Rev. 5, 10/2016", Depth=1.25mm, Height=0.5mm, Lead Free=LeadFree, Length=2mm, Manufacturer URL=http://www.yageo.com/, Military Standard=Not, Number of Pins=2, Package Reference=0805, Packaging=TapeandReel, Radiation Hardening=No, REACH SVHC=Unknown, RoHSCompliant=true, Termination=SMD/SMT, Voltage Rating (DC)=150V, Width=1.25mm
R5 R6 R7 R8 R9 R10 R11 R12: library part CMP-03412-013102-1, "RES 0.1 OHM 1% 1W 2512", Manufacturer=YAGEO, Package=RL2512, Power Rating=1W, Resistance=100mΩ, Temperature="-55°C to +155°C", Temperature Coefficient=600ppm/°C, Temperature Range High=+155°C, Temperature Range Low=-55°C, Tolerance=1%, Automotive=Yes, Automotive Grade="Grade 0", Category=Res, ComponentLink2Description=Datasheet, ComponentLink2URL=http://www.yageo.com/documents/recent/PYu-RL_Group_521_RoHS_L_2.pdf, Composition="Thick Film", Device Class L1="Passive Components", Device Class L2=Resistors, Device Class L3="Chip SMD Resistors", Digikey Description="RES 0.1 OHM 1% 1W 2512", Footprint Url=http://www.yageo.com/exep/pages/download/literatures/PYu-R_Mount_10.pdf, Height=0.65mm, Ipc Land Pattern Name=RESC635320X55, Lead Free=Yes, Manufacturer Part Number=RL2512FK-070R1L, Mouser Description="Current Sense Resistors 0.1ohm 1% 1W", Octopart=https://octopart.com/rl2512fk-070r1l-yageo-42334369, RoHS=TRUE, Series=RL
R13 R14 R15 R16 R17 R18 R19 R20 R21 R22 R23 R24 R25 R26 R27 R28 R29: library part CMP-2100-03671-1, "Chip Resistor, 1 KOhm, +/- 1%, 125 mW, -55 to 155 degC, 0805 (2012 Metric), RoHS, Tape and Reel", Case Code (Imperial)=0805, Case Code (Metric)=2012, Manufacturer=Yageo, Max Operating Temperature=155degC, Max Power Dissipation=125mW, Min Operating Temperature=-55degC, Package Description="2-Pin Surface Mounted Device, Body 2 x 1.25 mm", Package Quantity=1, Resistance=1KOhm, Temperature Coefficient=100ppm/degreesC, Tolerance=1%, Voltage Rating=150V, Case/Package=0805, Composition=ThickFilm, Datasheet URL=http://www.yageo.com/NewPortal/yageodocoutput?fileName=/pdf/R-Chip/PYu-RC_Group_51_RoHS_L_5.pdf, Datasheet Version="Rev. 5, 10/2016", Depth=1.25mm, Height=0.024inch, Lead Free=LeadFree, Length=0.079inch, Manufacturer URL=http://www.yageo.com/, Military Standard=Not, Number of Pins=2, Number of Terminations=2, Package Reference=0805, Packaging=TapeandReel, Power Rating=125mW, REACH SVHC=Unknown, RoHSCompliant=true, Termination=SMD/SMT, Voltage Rating (DC)=150V, Width=0.049inch
SW1: library part CMP-2000-05088-1, "Microminiature Tact Switch, SPST-NO, 50 mA, 12 VDC, -40 to 60 degC, 4-Pin SMD, RoHS, Tape and Reel", Actuator Color=N/A, Contact Rating @ Voltage=0.05@12VDCA, Dielectric Strength=250VAC, Manufacturer="C&K Components", Maximum Contact Resistance=100mOhm, Maximum DC Voltage Rating=12V, Minimum Insulation Resistance=100000MOhm, Operating Force=1.57N, Operating Temperature=-40to60C, Actuator Length=0.3mm, Actuator Style=RoundButton, Base Material=Nylon6/6,Glass/Polyester, Body Orientation=Straight, Contact Material=PhosphorBronze, Contact Plating=SilverClad, Datasheet URL=https://datasheet.ciiva.com/18145/getdatasheetpartid-226915-18145102.pdf, Datasheet Version=Apr-09, Dimension=5.25x6.4x1.5mm, ECCN=EAR99, Electrical Life=N/A, Family=PTS525, Ground Terminal=No, Housing Material=N/A, HTS=8536501199, Illumination Type=N/R, Manufacturer URL=http://www.ckswitches.com/, Maximum AC Voltage Rating=N/A, Mechanical Life=100000Cycles, Mounting=SurfaceMount,GullWing, Packaging=TapeandReel, Part No=PTS525SM10SMTRLFS, Pole Throw Configuration=SPST, Product Weight=N/A, RoHS=Yes, Seal Description=N/A, Seal Location=N/A, Supplier=C&KComponents, Supplier Standard Pack=3,000, Switch Configuration=N.O., Type=N/A
U1 U3: library part CMP-04910-000068-1, "LOW IQ, IDEAL DIODE CONTROLLER", Max Operating Temperature=125°C, Min Operating Temperature=-40°C, RoHS Compliant=Yes
U2 U4: library part CMP-04895-000095-1, Case/Package=VSSOP, Max Operating Temperature=125°C, Min Operating Temperature=-40°C, Output Current=10mA, Accuracy=0.1%, Mount="Surface Mount", Packaging="Tape and Reel", RoHS Compliant=Yes
U5 U6 U7 U8 U9 U10 U11 U12: library part CMP-04895-000038-1, "IC MONITOR PWR/CUR BIDIR 8VSSOP", Ambient Temperature Range High=+125°C, Ambient Temperature Range Low=-40°C, Input Bias Current=72uA, Input Offset Voltage=0.075mV, Manufacturer="Texas Instruments", Max Junction Temp=+150°C, Max Supply Voltage=36V, Min Supply Voltage=2.7V, Nominal Supply Current=300uA, Package=VSSOP8, Temperature="-40°C to +125°C", Voltage Gain=0.025/0.05/0.1/0.2V/mV, Automotive=No, Bandwidth=250kHz, Category=IC, ComponentLink2Description=Datasheet, ComponentLink2URL=http://www.ti.com/lit/ds/symlink/ina225.pdf, Device Class L1="Integrated Circuits (ICs)", Device Class L2="Linear ICs", Device Class L3=Instrumentation, Digikey Description="IC MONITOR PWR/CUR BIDIR 8VSSOP", Height=1.1mm, Ipc Land Pattern Name=SOIC65P490X110-8, Lead Free=Yes, Manufacturer Part Number=INA225AIDGKT, Mouser Description="Current Sense Amplifiers 36V Bidir 0-Drift Ser Crnt-Shunt Mon", Number Of Channels=1, Octopart=https://octopart.com/ina225aidgkt-texas+instruments-28946314, RoHS=TRUE, Standoff Height=0.05mm, Temperature Range High=+125°C, Temperature Range Low=-40°C
U13: library part CMP-04886-000014-1, "IC I/O EXPANDER 16B 24SSOP", Case/Package=SSOP, Max Operating Temperature=85°C, Max Supply Voltage=5.5V, Min Operating Temperature=-40°C, Min Supply Voltage=1.65V, Interface=I2C, Lead Free="Lead Free", Number of I/Os=16, Number of Pins=24, Packaging="Cut Tape", RoHS Compliant=Yes
U14: library part CMP-0237-00169-4, "ARM Cortex-M3 32-bit MCU, 128 KB Flash, 20 KB Internal RAM, 51 I/Os, 64-pin LQFP, -40 to 85 degC, Tape and Reel", I/Os (High Current)=51, Operating Frequency(F) (Processor speed) (MHz)=72, Supply Voltage(Vcc) min (V)=2, A/D Converter="2x12-bit (16 Channel)", ComponentLink1Description="Manufacturer URL", ComponentLink1URL=http://www.st.com/web/en/home.html, ComponentLink2Description=Datasheet, ComponentLink2URL=http://www.st.com/st-web-ui/static/active/en/resource/technical/document/datasheet/CD00161566.pdf, ComponentLink3Description="Package Specification", ComponentLink3URL=http://www.st.com/st-web-ui/static/active/en/resource/technical/document/datasheet/DM00037051.pdf, Core="ARM Cortex-M3", DatasheetVersion="Rev. 16", FLASH Size (Prog) (kB)=128, Internal RAM Size (kB)=20, Mounting Technology="Surface Mount", PackageDescription="64-Pin Low Profile Quad Flat Package, 10 x 10 mm Body, 0.5 mm Pitch", PackageReference=LQFP64, PackageVersion="Rev. 4, 06/2013", Packing="Tape and Reel", PartNumber=STM32F103RBT6TR
U15: library part CMP-0315-00015-3, "IC TRANSCEIVER HALF 1/1 8SOIC", Case/Package=D, Max Operating Temperature=85°C, Max Supply Current=17mA, Max Supply Voltage=3.6V, Min Operating Temperature=-40°C, Min Supply Voltage=3V, Operating Supply Voltage=3.3V, Package Quantity=1, Contact Plating=Gold, Data Rate=1Mbps, Lead Free="Lead Free", Nominal Supply Current=17mA, Number of Drivers=1, Number of I/Os=2, Number of Pins=8, Number of Receive Buffers=1, Number of Receivers=1, Number of Transceivers=1, Number of Transmit Buffers=1, Packaging="Tape and Reel", Radiation Hardening=No, REACH SVHC="No SVHC", Termination=SMD/SMT, Weight=0.002561oz
U16: library part CMP-0244-00088-1, "Fixed Low Drop Positive Voltage Regulator, 3.3V, 3-Pin DPAK, Tape and Reel", ComponentLink1Description="Manufacturer URL", ComponentLink1URL=http://www.st.com, ComponentLink2Description=Datasheet, ComponentLink2URL=http://www.st.com/internet/com/TECHNICAL_RESOURCES/TECHNICAL_LITERATURE/DATASHEET/CD00000544.pdf, DatasheetVersion=1/11/2011, PackageDescription="3-Pin Transistor Outline Package 2.28 mm Pitch, 9.7 mm Lead Span (DPAK)", PackageReference=TO-252, PackageVersion=2011
X1: library part CMP-2000-05036-1, "Low Frequency Crystal, 32.768 KHz, 6 pF, +/- 20 ppm, -40 to 85 degC, 4-Pin SMD, RoHS, Tape and Reel", Case Height=2.5mm, Case Length=8mm, Case Width=3.8mm, Frequency=32.768kHz, Load Capacitance=6pF, Manufacturer=Abracon, Operating Temperature Range=-40Cto+85C, Package / Case=8mmx3.8mm, Package Description="4-Pin Surface Mount Device, Body 8 x 3.8 mm, Pitch 5.5 mm", Package Reference=ABS25, Tolerance=20PPM, Brand=ABRACON, Datasheet URL=https://datasheet.ciiva.com/854/abs25-854528.pdf, Datasheet Version=Jun-17, Dimensions=3.8mmWx8mmLx2.5mmH, ESR=50kOhms, Factory Pack Quantity=3000, Manufacturer URL=http://www.abracon.com/, Mounting Style=SMD/SMT, Packaging=Reel, Product Category=Crystals, RoHS=Details, Series=ABS25, Termination Style=SMD/SMT, Type=LowFrequencyCrystal
X2: library part CMP-1774-00004-1, "SMD Seam Sealing Crystal, 8 MHz, +/- 30 ppm, 18 pF, -10 to 70 degC, 4-Pin SMD, RoHS, Tape and Reel", Case Code (Imperial)=0603, Case Code (Metric)=1608, Max Operating Temperature="155 degC", Min Operating Temperature="-55 degC", Package Quantity=5000, Power Rating="100 mW", Resistance="150 Ohm", Tolerance=1%, Voltage Rating="50 V", Case\Package=0603, ComponentLink1Description=Datasheet, ComponentLink1URL=http://www.txccorp.com/download/products/quartz_crystals/2015TXC_7B_19.pdf, DatasheetVersion=Jul-15, Height="0.45 mm", Length="1.6 mm", Mount="Surface Mount", PackageDescription="4-Pin Surface Mount Device, Body 5 x 3.2 mm, Pitch 3.7 mm", PackageReference=7B-4, Packaging="Tape and Reel", Pins=2, REACH SVHC="No SVHC", RoHSCompliant=true, Voltage Rating (DC)="50 V", Width="0.8 mm"

## Free pads (board coordinates)
  round 0 hole 3.2 paste-2539.97: 13(51,29) 13(51,43) 13(174,29) 13(174,43)

## Via types
v1: diameter 0.35, hole 0.2, Top Layer to Bottom Layer, tented both sides, 221 vias
v2: diameter 0.45, hole 0.3, Top Layer to Bottom Layer, tented both sides, 171 vias
v3: diameter 0.5, hole 0.35, Top Layer to Bottom Layer, tented both sides, 2 vias

## Nets (pads, with @x,y where several pads share a name; then routed paths per layer and width w, separated by ;. In a path a pad name is that pad's centre, name@x,y a point inside that pad or via, vN(x,y) a via of type N, cw(c..) or ccw(c..) an arc to the next point about the centre after c; other vN are vias at no path point)
+3.3: C3.2 C6.2 C7.2 C8.2 C9.2 C10.2 C11.2 C12.2 C13.2 C14.2 C15.1 C19.2 C20.1 C22.1 C23.1 C24.1 C25.1 C26.2 C28.1 D3.2 D4.2 D5.2 D6.2 D7.2 D8.2 D9.2 D10.2 D11.2 D12.2 D13.2 D14.2 D15.2 D16.2 D17.2 D18.2 P12.1 R2.2 R4.2 R30.2 R32.2 U2.1 U2.2 U2.6 U4.6 U5.3 U6.3 U7.3 U8.3 U9.3 U10.3 U11.3 U12.3 U13.24 U14.1 U14.13 U14.19 U14.32 U14.48 U14.64 U15.3 U16.4 | length 592.8
  Top Layer w0.18: 39.838,32.412 40,32.25 U2.1@40,31.05 ; R2.2@40,28.25 U2.1@40,31.05 ; U2.2@40.5,31.05 U2.1@40,31.05 ; C22.1@106.57,38.93 106.67,38.93 v2(107.3,38.3) ; C6.2@191,41.194 192.931,41.194 193.75,40.375 U4.6@193.75,39.8 193.81,39.86 193.81,40.375 193.81,40.616 194.495,41.301 194.881,41.301 196.879,43.3 R4.2@197.9,43.3
  Top Layer w0.35: C3.2@37.5,32.194 39.621,32.194 39.838,32.412 42.025,34.599 50.4,34.599 ; C7.2@45,53.944 54.714,53.944 54.77,54 ; D4.2@54.77,49.75 54.77,54 ; U15.3@60.865,37.914 60.865,36.99 59.875,36 57.75,36 56.349,34.599 50.4,34.599 ; C8.2@66,53.944 75.714,53.944 75.77,54 ; D6.2@75.77,49.75 75.77,54 ; C9.2@87,53.944 96.714,53.944 96.77,54 ; D8.2@96.77,49.75 96.77,54 ; C10.2@108,53.944 117.714,53.944 117.77,54 ; D10.2@117.77,49.75 117.77,54 ; C11.2@129,53.944 138.714,53.944 138.77,54 ; D12.2@138.77,49.75 138.77,54 ; C12.2@150,53.944 159.714,53.944 159.77,54 ; D14.2@159.77,49.75 159.77,54 ; C13.2@171,53.944 180.714,53.944 180.77,54 ; D16.2@180.77,49.75 180.77,54 ; C14.2@192,53.944 197.054,53.944 198.249,52.75 202.75,52.75 ; D18.2@200.5,48.48 202.75,50.73 202.75,52.75 ; 50.4,34.599 50.4,37.8 39.7,48.5 39.7,57.2 45.25,62.75 54.7,62.75 ; 54.7,62.75 54.77,62.68 D3.2@54.77,55.25 54.77,54 ; 54.7,62.75 75.77,62.75 ; 75.77,54 D5.2@75.77,55.25 75.77,62.75 ; 75.77,62.75 96.77,62.75 ; 96.77,54 D7.2@96.77,55.25 96.77,62.75 ; 96.77,62.75 117.77,62.75 ; 117.77,54 D9.2@117.77,55.25 117.77,62.75 ; 117.77,62.75 138.77,62.75 ; 138.77,54 D11.2@138.77,55.25 138.77,62.75 ; 138.77,62.75 159.77,62.75 ; 159.77,54 D13.2@159.77,55.25 159.77,62.75 ; 159.77,62.75 180.77,62.75 ; 180.77,54 D15.2@180.77,55.25 180.77,62.75 ; 180.77,62.75 198.75,62.75 200.5,61 D17.2@200.5,56.52 202.75,54.27 202.75,52.75
  Top Layer w0.5: C26.2@60.694,41.5 60.842,41.353 60.842,37.937 U15.3@60.865,37.914 ; v2(145.5,28.25) 147.5,28.25 148,27.75 167.25,27.75 170.75,31.25 170.75,34.15 U16.4@172.85,36.25 175.375,38.775 177.25,38.775 177.674,39.199 C28.1@177.75,39.199 179.299,39.199 183.4,43.3 188.5,43.3 ; C6.2@191,41.194 190.616,41.578 189.522,41.578 188.5,42.6 188.5,43.3 ; D18.2@200.5,48.48 200.5,48.4 199.3,47.2 193.3,47.2 189.4,43.3 188.5,43.3
  Bottom Layer w0.18: U5.3@44.675,52.599 44.736,52.66 44.736,53.663 45,53.927 v2(45,54) ; U6.3@65.675,52.599 65.736,52.66 65.736,53.663 66,53.927 v2(66,54) ; U7.3@86.675,52.599 86.736,52.66 86.736,53.663 87,53.927 v2(87,54) ; v2(106,34.9) 106.062,34.9 106.445,34.518 107.714,34.518 U14.64@108.032,34.836 ; v2(107.3,38.3) 107.348,38.3 107.984,37.664 U14.1@108.032,37.664 ; U8.3@107.675,52.599 107.736,52.66 107.736,53.663 108,53.927 v2(108,54) ; U14.13@112.275,41.907 112.275,41.822 112.75,41.347 112.75,40.924 ; U14.19@116.871,42.26 v2(116.119,41.508) ; v2(120.75,36.75) 120.698,36.802 120.698,37.171 120.672,37.197 ; U14.32@121.468,37.664 121.383,37.664 120.916,37.197 120.672,37.197 ; P12.1@124.37,27.75 122.87,26.25 121,26.25 120.257,26.993 120.257,28.151 120.25,28.158 120.25,28.81 119.68,29.38 C25.1@119.68,29.93 119.68,29.88 118.701,28.901 116.795,28.901 U14.48@116.164,29.532 115,30.697 ; U9.3@128.675,52.599 128.736,52.66 128.736,53.663 129,53.927 v2(129,54) ; U13.24@139.286,31.48 139.431,31.625 U13.24@140.275,31.625 140.275,30.625 140.25,30.6 ; U10.3@149.675,52.599 149.736,52.66 149.736,53.663 150,53.927 v2(150,54) ; U11.3@170.675,52.599 170.736,52.66 170.736,53.663 171,53.927 v2(171,54) ; U12.3@191.675,52.599 191.736,52.66 191.736,53.663 192,53.927 v2(192,54) ; U14.64@108.032,34.836 108.117,34.836 108.393,35.112 108.584,35.303 110.197,35.303 114.803,30.697 115,30.697 ; U14.64@108.032,34.836 108.351,35.154 108.351,35.239 107.5,36.09 107.5,37.132 U14.1@108.032,37.664 ; U14.1@108.032,37.664 108.697,37 109.529,37 112.75,40.221 112.75,40.924 ; 112.75,40.924 v2(113.546,40.924) 115.534,40.924 v2(116.119,41.508) ; 115,30.697 115,35 117.197,37.197 120.429,37.197 ; v2(116.119,41.508) 120.429,37.197 ; 120.429,37.197 120.672,37.197
  Bottom Layer w0.5: P12.1@124.37,27.75 124.87,27.25 124.87,26.88 124.979,26.771 136.082,26.771 137.903,28.592 137.903,28.998 C15.1@138.306,29.4 138.306,29.476 139.43,30.6 140.25,30.6 R32.2@143.2,30.6 ; R32.2@143,30.75 143.15,30.6 R32.2@143.2,30.6 ; v2(145.5,28.25) 145.5,30.4 R30.2@145.55,30.45 ; R30.2@145.5,30.75 145.5,30.6 145.35,30.75 143.35,30.75 R32.2@143.2,30.6